# Altium PCB 后改2025底板线路板图.PcbDoc (part 3 of 4)
Units mm, origin at the board's own origin, x right, y up, seen from the top; angles counter-clockwise.
Board outline 200 x 230 mm, 4 copper layers (Top Layer, GND, POWER, Bottom Layer), stack 0.603 mm thick; 355 components, 331 nets, 1313 pads, 565 vias.
Unrouted connection lines stored in the file: 251.
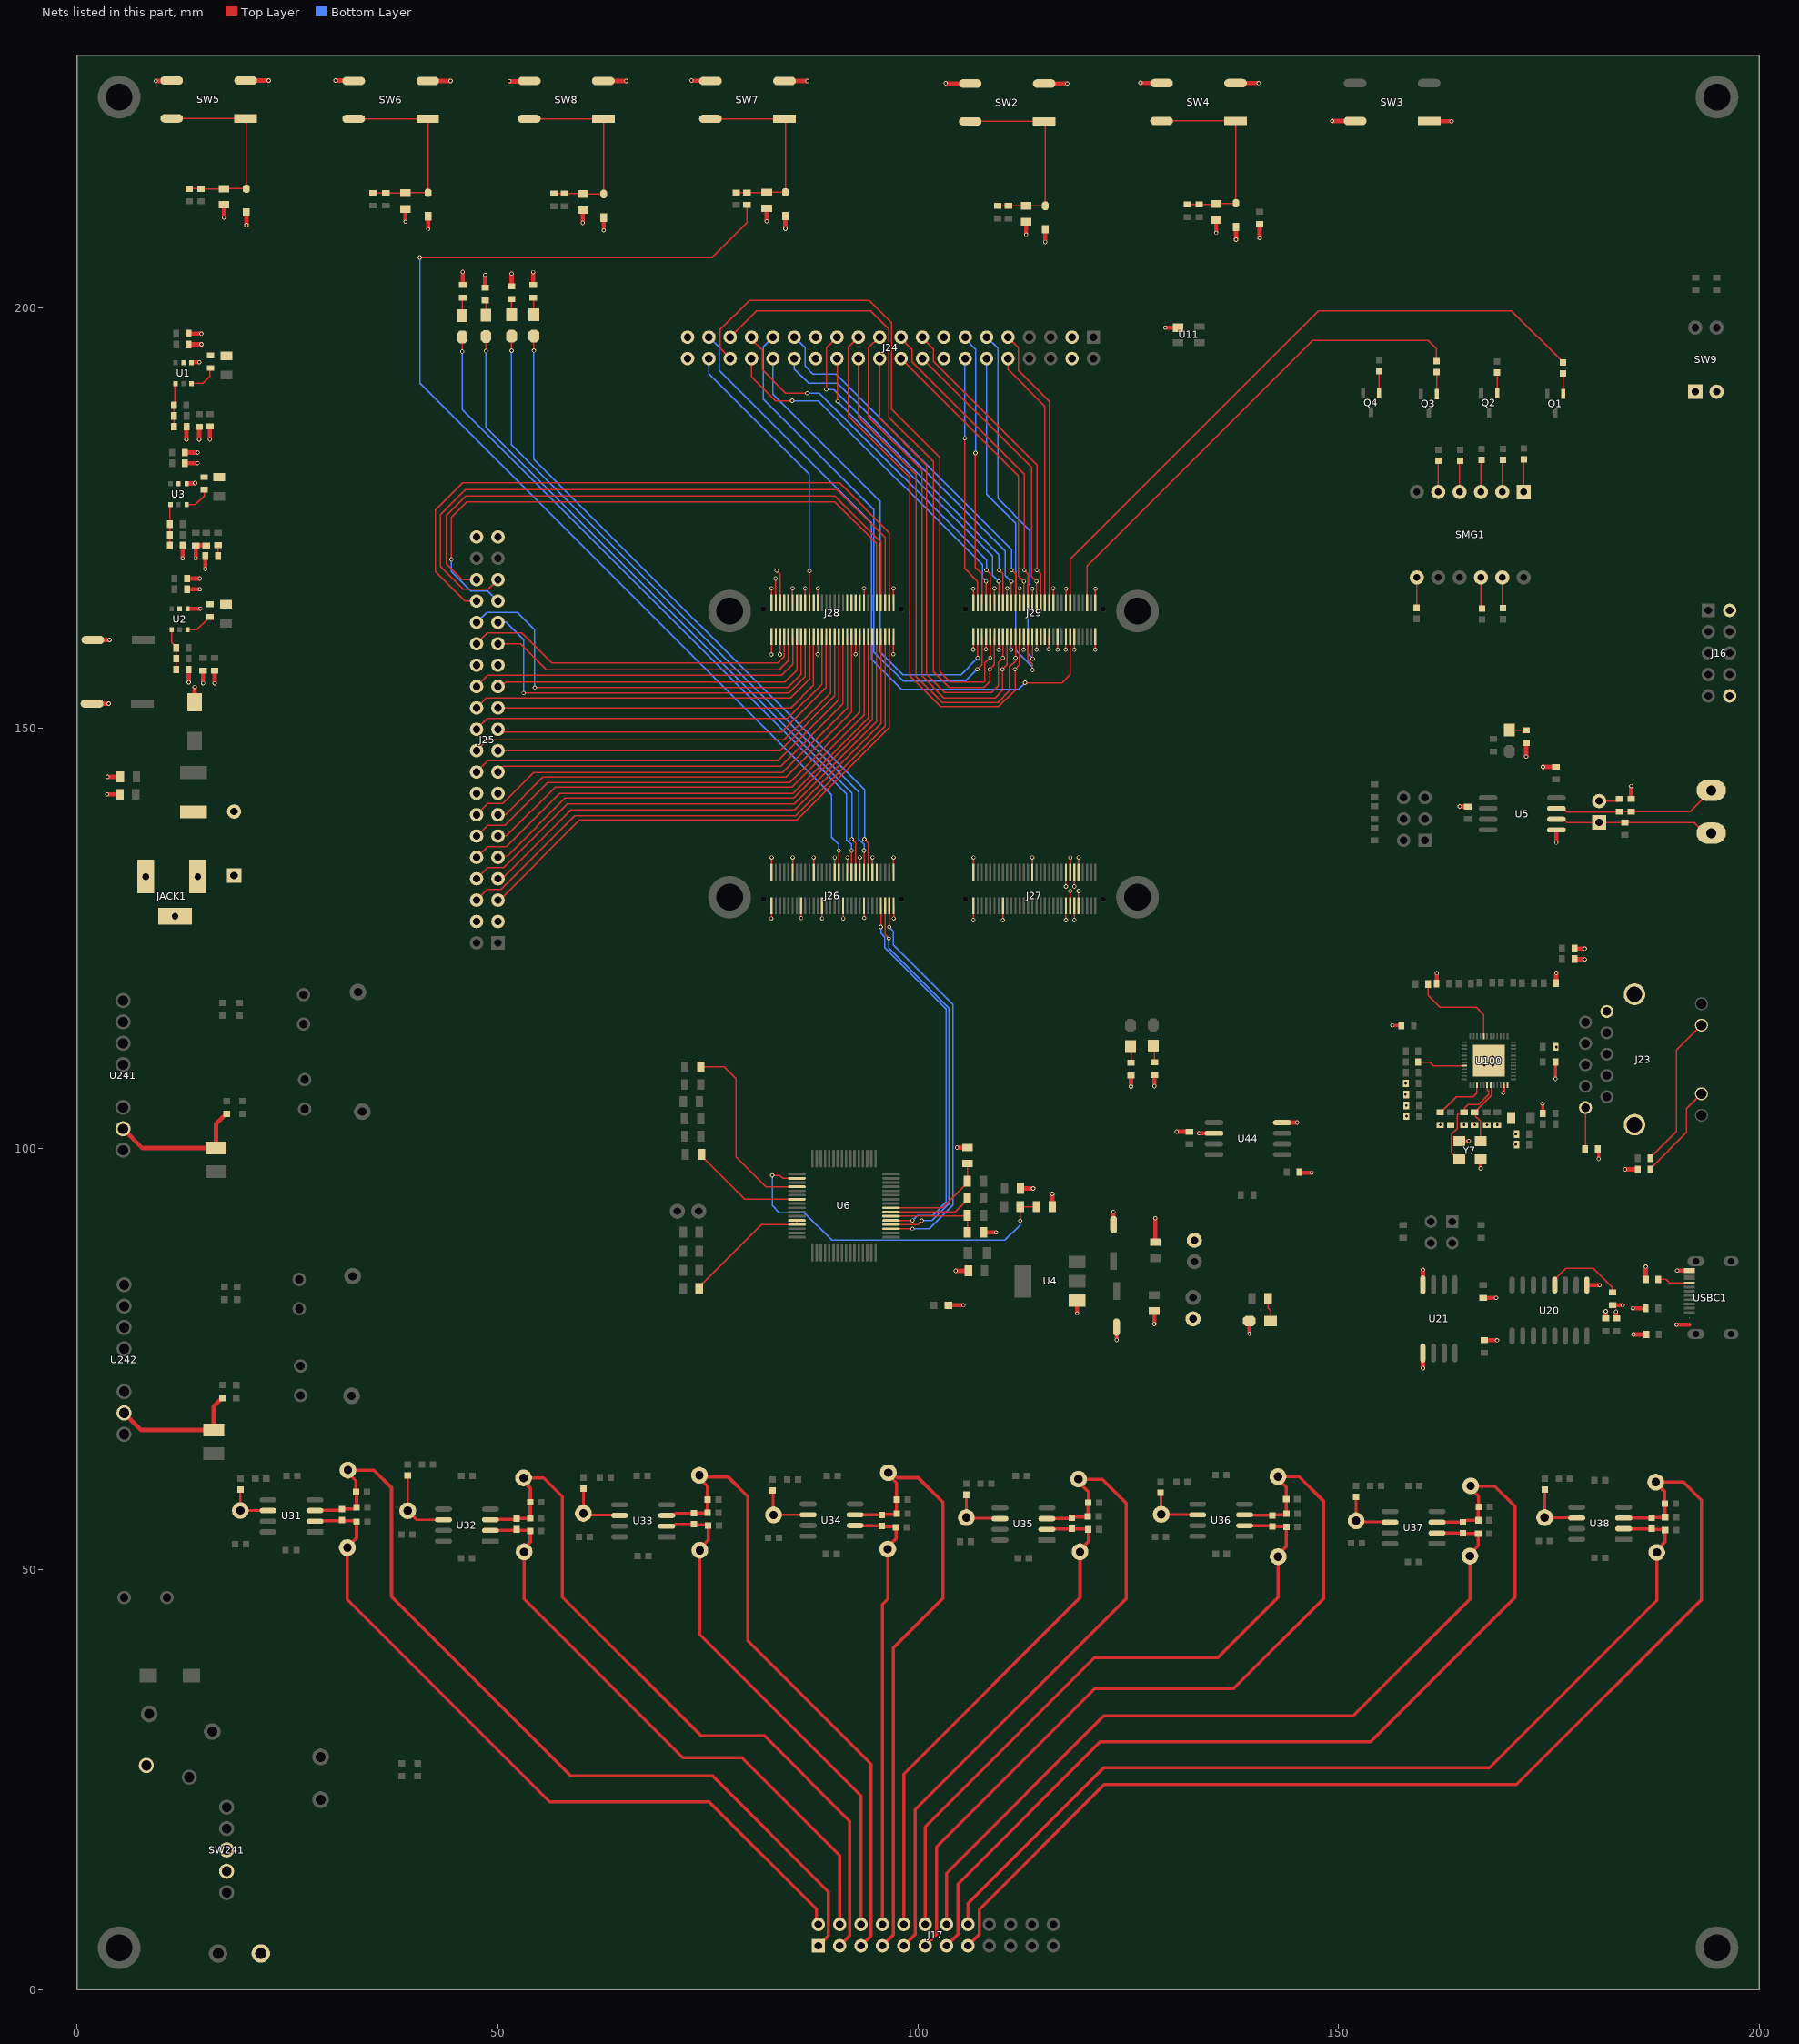
[diagram p5: the nets of this part, all layers, seen from the top]

## Via types
v1: diameter 0.508, hole 0.305, Top Layer to Bottom Layer, tented both sides, 558 vias
v2: diameter 0.635, hole 0.305, Top Layer to Bottom Layer, tented both sides, 7 vias

## Nets (pads, with @x,y where several pads share a name; then routed paths per layer and width w, separated by ;. In a path a pad name is that pad's centre, name@x,y a point inside that pad or via, vN(x,y) a via of type N, cw(c..) or ccw(c..) an arc to the next point about the centre after c; other vN are vias at no path point) (continued)
GND: C1.2 C2.2 C3.1 C4.1 C7.1 C8.1 C9.1 C10.1 C11.1 C12.1 C13.1 C14.1 C18.1 C19.1 C20.1 C21.1 C25.1 C29.1 C31.1 C35.1 C36.1 C37.1 C38.1 C39.1 C41.1 C42.1 C52.1 C53.1 C54.1 C55.1 C64.1 C65.2 C78.1 C79.1 C80.1 C81.1 C82.1 C83.1 C84.1 C113.1 C114.1 C146.1 C147.2 C148.2 C151.1 C152.1 C153.1 C154.1 C155.1 C156.1 C157.1 C158.1 CE1.2 CE2.2 D1.2 D2.1 J3.2 J4.2 J16.2 J16.10 J23.10 J23.15 J23.16 J24.3 J24.4 J24.15 J24.16 J24.27 J24.28 J24.39 J24.40 J25.3 J25.4 J25.15 J25.16 J25.27 J25.28 J25.39 J25.40 J26.1@97.078,128.889 J26.2 J26.12 J26.15 J26.18 J26.24 J26.25 J26.30 J26.35 J26.40 J26.45 J26.50 J26.59 J26.60 J27.9 J27.10 J27.11 J27.12 J27.13 J27.14 J27.15 J27.16 J27.32 J27.45 J27.59 J27.60 J28.1@97.078,164.889 J28.2 J28.15 J28.20 J28.37 J28.38 J28.43 J28.49 J28.56 J28.59 J28.60 J29.1@121.078,164.889 J29.2 J29.12 J29.15 J29.16 J29.20 J29.21 J29.24 J29.30 J29.31 J29.36 J29.37 J29.42 J29.43 J29.48 J29.49 J29.54 J29.59 J29.60 JACK1.2 JACK1.3 L4.2 LED1.2 R8.1 R9.1 R11.1 R13.1 R16.1 R17.1 R18.2 R19.1 R48.1 R52.1 R55.2 R57.1 R64.2 R96.1 R99.1 R103.1 R105.1 R106.1 R107.1 R113.1 R184.2 R185.2 R189.1 SW2.2 SW2.3 SW3.1 SW3.4 SW4.2 SW4.3 SW5.2 SW5.3 SW6.2 SW6.3 SW7.2 SW7.3 SW8.2 SW8.3 SW9.1 SW9.2 U1.1 U2.1 U3.1 U4.1 U5.5 U11.1 U20.1 U21.4 U21.5 U44.2 U44.8 U100.47 U100.49 USBC1.A1B12 USBC1.B1A12 Y7.2 Y7.4 Z1.1 Z2.1 Z3.1 Z4.1 Z5.1 Z6.1 | length 265.7
  Top Layer w0.152: v1(82.55,127.368) 82.564,127.382 82.564,128.875 J26.59@82.578,128.889 ; v1(82.55,158.75) 82.564,158.764 82.564,160.875 J28.60@82.578,160.889 ; J28.59@82.57,164.881 J28.59@82.578,164.889 v1(82.578,166.609) ; J26.60@82.578,132.889 82.582,132.893 82.582,134.613 v1(82.586,134.617) ; v1(83.566,158.75) 83.572,158.756 83.572,160.883 J28.56@83.578,160.889 ; J28.49@85.071,164.881 J28.49@85.078,164.889 v1(85.078,166.609) ; J26.50@85.078,132.889 85.082,132.893 85.082,134.613 v1(85.086,134.617) ; J26.45@86.078,128.889 86.087,128.88 86.087,127.415 v1(86.096,127.406) ; J28.43@86.57,164.881 J28.43@86.578,164.889 v1(86.578,166.609) ; J26.40@87.574,132.885 J26.40@87.578,132.889 87.578,134.609 v1(87.582,134.613) ; J28.37@88.071,164.881 J28.37@88.078,164.889 v1(88.078,166.609) ; v1@88.078,158.778 J28.38@88.078,160.889 ; J26.35@88.578,128.889 88.58,128.887 88.58,127.371 v1(88.582,127.368) ; J26.30@90.074,132.885 J26.30@90.078,132.889 90.078,134.609 v1(90.082,134.613) ; J26.25@91.078,128.889 91.099,128.868 v1(91.099,127.368) v1@91.089,127.379 ; J26.24@91.574,132.885 J26.24@91.578,132.889 91.578,134.609 v1(91.582,134.613) ; v1@92.578,158.778 J28.20@92.578,160.889 ; J26.18@93.074,132.885 J26.18@93.078,132.889 93.078,134.609 v1(93.082,134.613) ; J28.15@93.57,164.881 J28.15@93.578,164.889 v1(93.578,166.609) ; J26.15@93.578,128.889 93.587,128.88 93.587,127.415 v1(93.595,127.406) ; J26.12@94.574,132.885 J26.12@94.578,132.889 94.578,134.609 v1(94.582,134.613) ; J28.1@97.071,164.881 J28.1@97.078,164.889 v1(97.078,166.609) ; J26.2@97.074,132.885 J26.2@97.078,132.889 97.078,134.609 v1(97.082,134.613) ; J26.1@97.078,128.889 97.099,128.868 v1(97.099,127.368) v1@97.089,127.379 ; v1@97.078,158.778 J28.2@97.078,160.889 ; v1(106.553,159.334) 106.553,160.864 J29.60@106.578,160.889 J29.60@106.584,160.895 ; v1(106.553,166.56) 106.565,166.548 106.565,164.901 J29.59@106.578,164.889 ; v1(106.572,127.163) 106.576,127.167 106.576,128.887 J27.59@106.58,128.891 ; J27.60@106.576,132.887 106.58,132.891 106.58,134.611 v1(106.584,134.615) ; v1(108.065,159.373) 108.065,160.876 J29.54@108.078,160.889 J29.54@108.084,160.895 ; J29.49@109.078,164.889 109.086,164.896 v1(109.086,166.617) ; v1(109.576,159.309) v1(109.576,159.309) 109.577,160.878 J29.48@109.576,160.879 ; v1(110.072,127.163) 110.076,127.167 110.076,128.887 J27.45@110.08,128.891 ; J29.43@110.578,164.889 110.593,164.904 v1(110.593,166.6) ; v1(111.063,159.323) 111.063,160.874 J29.42@111.078,160.889 J29.42@111.084,160.895 ; J29.37@112.078,164.889 v1(112.078,166.624) ; v1(112.557,159.317) 112.557,160.868 J29.36@112.578,160.889 ; J27.32@113.576,132.887 113.58,132.891 113.58,134.611 v1(113.584,134.615) ; J29.31@113.578,164.889 113.59,164.901 v1(113.59,166.549) ; J29.30@114.084,160.895 114.087,160.892 114.087,159.318 v1(114.097,159.309) ; v1(115.519,159.368) 115.549,159.398 115.549,160.86 J29.24@115.574,160.885 ; J29.21@116.078,164.889 v1(116.078,166.624) ; J29.20@116.582,160.893 116.582,159.313 v1(116.586,159.309) ; v1(117.551,159.309) 117.565,159.322 117.565,160.876 J29.16@117.578,160.889 J29.16@117.584,160.895 ; v1(117.57,127.161) 117.574,127.165 117.574,128.885 J27.15@117.578,128.889 ; v1(117.57,131.161) 117.574,131.165 117.574,132.885 J27.16@117.578,132.889 ; J29.15@117.578,164.889 117.59,164.901 v1(117.59,166.549) ; J27.13@118.078,128.889 118.082,128.893 118.082,130.613 v1(118.086,130.617) ; J27.14@118.078,132.889 118.082,132.893 118.082,134.613 v1(118.086,134.617) ; v1(118.567,159.309) 118.573,159.314 118.573,160.884 J29.12@118.578,160.889 J29.12@118.584,160.895 ; v1(118.57,127.161) 118.574,127.165 118.574,128.885 J27.11@118.578,128.889 ; v1(118.57,131.161) 118.574,131.165 118.574,132.885 J27.12@118.578,132.889 ; J27.9@119.078,128.889 119.082,128.893 119.082,130.613 v1(119.086,130.617) ; J27.10@119.078,132.889 119.082,132.893 119.082,134.613 v1(119.086,134.617) ; v1(121.056,159.309) 121.067,159.32 121.067,160.878 J29.2@121.078,160.889 J29.2@121.084,160.895 ; J29.1@121.078,164.889 121.09,164.901 121.09,166.549 v1(121.102,166.56)
  Top Layer w0.254: SW5.2@20.021,227.004 SW5.2@20.046,226.979 ; SW6.2@41.662,226.953 SW6.2@41.687,226.928 ; SW8.2@62.541,226.953 SW8.2@62.566,226.928 ; SW7.2@84.08,226.953 SW7.2@84.105,226.928 ; SW2.2@114.966,226.648 SW2.2@114.992,226.623 ; SW4.2@137.725,226.699 SW4.2@137.75,226.674 ; SW3.4@151.962,222.174 SW3.4@151.988,222.148 ; SW3.1@160.661,222.174 SW3.1@160.686,222.148 ; v1(169.582,106.629) 169.582,106.698 169.665,106.781 U100.47@169.665,107.544
  Top Layer w0.381: v1@156.396,114.656 C155.1@157.541,114.656 ; Y7.2@164.338,100.904 v1@165.483,100.904 ; v1@166.878,97.659 Y7.4@166.878,98.804 ; C154.1@174.26,104.191 v1@174.26,105.336 ; v1(175.787,108.299) C52.1@175.787,110.305 ; v1@180.907,98.779 C42.1@180.907,99.924
  Top Layer w0.508: C1.2@1.775,152.908 v1(3.762,152.908) ; C2.2@1.874,160.477 v1(3.861,160.477) ; v1(3.561,142.113) C3.1@5.085,142.113 ; v1(3.622,144.2) C4.1@5.146,144.2 ; v1(9.347,226.924) 11.191,226.924 SW5.3@11.246,226.979 ; v1(12.549,170.18) R13.1@12.549,171.704 ; C18.1@12.815,181.483 v1(14.339,181.483) ; C19.1@12.815,182.753 v1(14.339,182.753) ; v1(13.008,184.308) R8.1@13.008,185.832 ; U3.1@13.015,179.07 13.936,179.07 13.999,179.133 v1(14.034,179.133) ; C10.1@13.069,166.497 v1(14.593,166.497) ; C9.1@13.069,167.767 v1(14.593,167.767) ; U2.1@13.142,164.171 v1(14.666,164.171) ; C7.1@13.269,195.611 v1(14.793,195.611) ; C8.1@13.269,196.881 v1(14.793,196.881) ; v1(13.272,155.439) R9.1@13.272,156.963 ; U1.1@13.523,193.484 v1(14.541,193.484) ; D2.1@13.97,153.063 v1(13.97,154.889) ; v1(14.097,170.192) C21.1@14.097,171.716 C20.1@15.367,171.716 ; v1(14.511,184.308) C13.1@14.511,185.832 ; v1(14.986,155.321) C14.1@14.986,156.845 ; v1(15.24,168.91) LED1.2@15.24,170.434 ; v1(15.781,184.32) C11.1@15.781,185.844 ; v1(16.352,155.324) C12.1@16.352,156.848 ; v1(17.463,210.687) C81.1@17.463,212.211 ; SW5.2@20.046,226.979 v1(22.784,226.979) ; v1(20.13,209.79) Z3.1@20.13,211.314 ; v1(30.734,226.979) SW6.3@32.989,226.979 ; v1(39.044,210.187) C82.1@39.044,211.711 ; SW6.2@41.687,226.928 v1(44.425,226.928) ; v1(41.726,209.316) Z4.1@41.726,210.84 ; R106.1@45.86,202.685 v1(45.86,204.209) ; R107.1@48.522,202.348 v1(48.522,203.872) ; v1(51.41,226.898) 51.433,226.875 53.813,226.875 SW8.3@53.836,226.852 ; R103.1@51.656,202.501 v1(51.656,204.025) ; R105.1@54.242,202.68 v1(54.242,204.204) ; v1(60.135,210.06) C84.1@60.135,211.584 ; SW8.2@62.566,226.928 v1(65.303,226.928) ; v1(62.611,209.166) Z6.1@62.611,210.69 ; v1(73.05,226.974) 73.074,226.951 75.384,226.951 SW7.3@75.407,226.928 ; v1(81.998,210.252) C83.1@81.998,211.776 ; SW7.2@84.105,226.928 v1(86.843,226.928) ; v1(84.22,209.358) Z5.1@84.22,210.882 ; v1(103.276,226.67) 103.3,226.646 106.372,226.646 SW2.3@106.395,226.623 ; L4.2@103.861,81.382 v1(105.385,81.382) ; v1(104.46,85.471) C41.1@105.984,85.471 ; v1(104.623,100.139) R16.1@105.857,100.139 ; R19.1@107.757,90.043 v1(109.281,90.043) ; C29.1@112.169,95.258 v1(113.693,95.258) ; v1(112.84,208.666) C78.1@112.84,210.19 ; SW2.2@114.992,226.623 v1(117.729,226.623) ; v1(115.126,207.772) Z1.1@115.126,209.296 ; R11.1@115.954,93.099 v1(115.954,94.623) ; v1(118.91,80.411) U4.1@118.91,81.935 ; CE1.2@123.241,90.948 v1(123.241,92.472) ; v1(123.596,77.25) CE2.2@123.596,78.774 ; R99.1@125.311,108.711 125.313,108.708 125.313,107.38 v1(125.316,107.377) ; v1(126.441,226.72) 126.464,226.697 129.028,226.697 SW4.3@129.052,226.674 ; v1(128.08,79.156) C35.1@128.08,80.68 ; R96.1@128.087,108.761 128.089,108.759 128.089,107.43 v1(128.092,107.428) ; C31.1@128.207,88.875 v1(128.207,91.719) ; v1(129.388,197.587) U11.1@130.912,197.587 ; v1(130.743,102.02) C113.1@132.267,102.02 ; v1(133.405,101.829) U44.2@134.929,101.829 ; v1(135.445,208.884) C80.1@135.445,210.408 ; SW4.2@137.75,226.674 v1(140.487,226.674) ; v1(137.795,208.048) Z2.1@137.795,209.572 ; v1(139.382,77.978) D1.2@139.382,79.502 ; v1(140.614,208.282) C79.1@140.614,209.806 ; U44.8@143.557,103.099 v1(145.081,103.099) ; C114.1@145.281,97.14 v1(146.805,97.14) ; v1(149.225,222.174) SW3.4@151.962,222.174 ; v1(160.02,73.914) U21.5@160.02,75.692 ; U21.4@160.02,83.82 v1(160.02,85.598) ; SW3.1@160.686,222.148 v1(163.424,222.148) ; R57.1@161.646,119.634 161.659,119.647 161.659,120.84 v1(161.672,120.853) ; v1(164.389,140.679) R17.1@165.354,140.679 ; C65.2@167.195,82.257 v1(168.719,82.257) ; C64.1@167.322,77.216 v1(168.846,77.216) ; v1(172.291,146.601) R113.1@172.291,148.125 ; v1(174.308,145.39) C25.1@175.832,145.39 ; R52.1@175.858,119.685 175.871,119.698 175.871,120.891 v1(175.884,120.904) ; v1(175.895,136.373) U5.5@175.895,137.897 ; C36.1@178.054,122.53 178.067,122.516 179.26,122.516 v1(179.273,122.503) ; C37.1@178.054,123.8 178.067,123.786 179.26,123.786 v1(179.273,123.773) ; U20.1@179.514,83.782 v1(181.038,83.782) ; v1(181.762,80.67) 181.766,80.667 181.766,79.913 181.769,79.909 C147.2@181.769,79.817 ; C146.1@182.562,81.319 C146.1@182.625,81.382 ; C146.1@182.562,81.419 182.6,81.382 C146.1@182.625,81.382 ; C146.1@182.644,81.4 C146.1@182.625,81.382 ; v1(182.982,80.62) 182.982,79.913 183.039,79.855 C148.2@183.039,79.817 ; v1@183.761,81.382 C146.1@182.625,81.382 ; v1(184.064,97.542) R48.1@185.588,97.542 ; R18.2@184.785,141.58 v1(184.785,143.104) ; v1(184.987,81.026) R185.2@186.511,81.026 ; v1(185.051,77.915) R189.1@186.575,77.915 ; R184.2@186.524,84.455 v1(186.524,85.979) ; v1(190.183,79.084) USBC1.A1B12@191.707,79.084 ; v1(190.25,85.494) USBC1.B1A12@191.774,85.494
  other v1: 183.794,81.382 166.884,97.653 180.914,98.772 171.064,100.477 165.489,100.911 171.064,101.727 162.069,102.828 164.913,102.828 166.171,102.828 167.636,102.828 168.865,102.828 158.063,103.858 158.051,105.128 174.254,105.342 157.951,106.426 157.983,107.753 167.335,109.931 168.351,109.931 167.335,110.896 168.351,110.896 175.887,112.091 156.39,114.649 88.064,158.764 92.564,158.764 97.064,158.764
H15: J26.28 R109.2 | length 136.4
  Top Layer w0.152: v1(40.742,205.943) 75.489,205.943 79.648,210.102 R109.2@79.648,212.176 ; J26.28@90.578,132.889 v1(90.578,135.433)
  Bottom Layer w0.152: v1(40.742,205.943) 40.742,191.008 89.713,142.037 89.713,137.012 90.578,136.147 v1(90.578,135.433)
H16: J28.51
H17: J28.53
H18: J28.57 | length 2.9
  Top Layer w0.152: v1(83.058,167.767) 83.068,167.757 83.068,164.899 J28.57@83.078,164.889
IO1+: 12.1 C202.2 J17.1 R201.2 R211.1 U31.3 | length 102
  Top Layer w0.381: U31.3@28.287,56.974 28.331,57.018 31.364,57.018 R201.2@31.496,57.15 32.995,57.15 C202.2@33.225,57.38 R211.1@33.225,58.88 ; R211.1@33.149,59.172 33.149,60.515 32.194,61.47 12.1@32.194,61.783 35.285,61.783 37.389,59.679 37.389,46.736 58.674,25.451 75.54,25.451 89.332,11.659 89.332,6.426 J17.1@88.138,5.232
IO1-: 11.1 C201.1 J17.2 R201.1 U31.2 | length 87.7
  Top Layer w0.381: U31.2@28.287,55.704 28.331,55.748 31.394,55.748 R201.1@31.496,55.85 ; R201.1@31.503,55.843 31.56,55.786 33.041,55.786 C201.1@33.225,55.602 33.225,53.706 32.131,52.612 11.1@32.131,52.578 32.131,46.406 56.185,22.352 75.133,22.352 87.905,9.58 87.905,8.006 J17.2@88.138,7.772
IO2+: 22.1 C206.2 J17.3 R202.2 R212.1 U32.3 | length 87.9
  Top Layer w0.381: U32.3@49.149,55.88 49.193,55.924 52.147,55.924 R202.2@52.261,56.037 52.277,56.054 53.865,56.054 C206.2@53.881,56.07 R212.1@53.881,57.963 53.881,59.625 53.086,60.42 22.1@53.086,60.858 55.47,60.858 57.709,58.62 57.709,46.685 74.219,30.175 81.737,30.175 91.872,20.041 91.872,6.426 J17.3@90.678,5.232
IO2-: 21.1 C205.1 J17.4 R202.1 U32.2 | length 71.6
  Top Layer w0.381: U32.2@49.149,54.61 49.193,54.654 52.177,54.654 R202.1@52.261,54.737 52.356,54.642 53.786,54.642 C205.1@53.881,54.546 53.881,53.24 53.149,52.508 21.1@53.149,52.07 53.149,46.469 72.028,27.591 79.038,27.591 90.678,15.951 J17.4@90.678,7.772
IO3+: 32.1 C210.2 J17.5 R203.2 R213.1 U33.3 | length 76.3
  Top Layer w0.381: U33.3@70.104,56.388 70.877,56.388 71.131,56.642 R203.2@73.343,56.642 73.374,56.674 74.932,56.674 C210.2@74.963,56.706 R213.1@74.963,57.946 ; R213.1@74.951,58.268 74.951,59.893 73.998,60.846 32.1@73.998,61.163 74.232,60.93 77.45,60.93 79.756,58.623 79.756,41.504 94.412,26.848 94.412,6.426 J17.5@93.218,5.232
IO3-: 31.1 C209.1 J17.6 R203.1 U33.2 | length 60.9
  Top Layer w0.381: U33.2@70.104,55.118 70.877,55.118 71.101,55.342 R203.1@73.343,55.342 73.423,55.262 74.962,55.262 C209.1@75.042,55.181 75.042,53.482 74.041,52.481 31.1@74.041,52.261 74.041,42.24 93.218,23.063 J17.6@93.218,7.772
IO4+: 42.1 C214.2 J17.7 R204.2 R214.1 U34.3 | length 73.7
  Top Layer w0.381: U34.3@92.51,56.466 92.534,56.442 95.671,56.442 R204.2@95.694,56.418 95.775,56.498 97.362,56.498 C214.2@97.442,56.578 R214.1@97.442,57.946 ; J17.7@95.758,5.232 97.079,6.553 97.079,40.691 102.972,46.584 102.972,57.912 100.01,60.874 97.496,60.874 96.895,61.475 42.1@96.456,61.475 96.456,61.225 97.442,60.239 R214.1@97.442,58.268
IO4-: 41.1 C213.1 J17.8 R204.1 U34.2 | length 52.8
  Top Layer w0.381: U34.2@92.51,55.196 92.549,55.157 95.656,55.157 R204.1@95.694,55.118 95.758,55.054 97.315,55.054 C213.1@97.379,54.991 97.379,53.624 96.393,52.638 41.1@96.393,52.387 96.393,46.457 95.758,45.822 J17.8@95.758,7.772
IO5+: 52.1 C218.2 J17.9 R205.2 R215.1 U35.3 | length 80.4
  Top Layer w0.381: J17.9@98.298,5.232 99.644,6.579 99.644,21.412 124.765,46.533 124.765,57.836 121.895,60.706 52.1@119.075,60.706 119.075,60.359 120.239,59.195 R215.1@120.239,57.912 120.215,57.888 120.215,56.285 C218.2@120.191,56.261 120.11,56.181 118.381,56.181 R205.2@118.3,56.101 118.251,56.051 115.36,56.051 U35.3@115.316,56.007
IO5-: 51.1 C217.1 J17.10 R205.1 U35.2 | length 61
  Top Layer w0.381: J17.10@98.298,7.772 98.298,25.654 119.253,46.609 51.1@119.253,52.07 119.253,52.32 120.239,53.306 C217.1@120.239,54.737 120.207,54.769 118.332,54.769 R205.1@118.3,54.8 118.269,54.769 115.348,54.769 U35.2@115.316,54.737
IO6+: 62.1 C222.2 J17.11 R206.2 R216.1 U36.3 | length 98.7
  Top Layer w0.381: J17.11@100.838,5.232 102.184,6.579 102.184,16.993 121.006,35.814 137.516,35.814 148.184,46.482 148.184,58.115 145.288,61.011 62.1@142.789,61.011 142.789,60.76 143.774,59.774 R216.1@143.774,58.318 143.786,58.307 143.786,56.59 C222.2@143.797,56.578 143.71,56.491 142.201,56.491 R206.2@142.113,56.403 142.087,56.429 138.853,56.429 U36.3@138.826,56.456
IO6-: 61.1 C221.1 J17.12 R206.1 U36.2 | length 78.7
  Top Layer w0.381: J17.12@100.838,7.772 100.838,19.355 120.955,39.472 135.636,39.472 142.811,46.647 61.1@142.811,51.498 142.811,51.749 143.797,52.735 C221.1@143.797,55.054 143.773,55.079 142.137,55.079 R206.1@142.113,55.103 142.072,55.144 138.868,55.144 U36.2@138.826,55.186
IO7+: 72.1 C226.2 J17.13 R207.2 R217.1 U37.3 | length 114.8
  Top Layer w0.381: J17.13@103.378,5.232 104.724,6.579 104.724,12.573 121.615,29.464 153.772,29.464 170.993,46.685 170.993,57.455 168.554,59.893 72.1@165.71,59.893 165.71,59.592 166.67,58.631 R217.1@166.67,57.389 ; U37.3@161.695,55.582 161.697,55.58 164.78,55.58 R207.2@164.783,55.577 164.973,55.768 165.148,55.768 165.196,55.817 C226.2@166.609,55.817 R217.1@166.609,57.389
IO7-: 71.1 C225.1 J17.14 R207.1 U37.2 | length 95
  Top Layer w0.381: J17.14@103.378,7.772 103.378,13.868 122.072,32.563 151.74,32.563 165.608,46.431 71.1@165.608,51.562 165.608,51.812 166.594,52.798 C225.1@166.594,54.229 166.57,54.253 164.807,54.253 R207.1@164.783,54.277 164.765,54.295 161.712,54.295 U37.2@161.695,54.312
IO8+: 82.1 C230.2 J17.15 R208.2 R218.1 U38.3 | length 133.7
  Top Layer w0.381: J17.15@105.918,5.232 107.264,6.579 107.264,9.525 122.123,24.384 171.145,24.384 193.142,46.38 193.142,58.217 191.008,60.35 82.1@187.706,60.35 187.706,60.282 188.783,59.205 R218.1@188.783,57.81 188.801,57.792 188.801,56.215 C230.2@188.819,56.197 188.77,56.149 187.246,56.149 R208.2@187.198,56.101 187.19,56.093 183.904,56.093 U38.3@183.896,56.085
IO8-: 81.1 C229.1 J17.16 R208.1 U38.2 | length 113.1
  Top Layer w0.381: J17.16@105.918,7.772 105.918,10.262 122.072,26.416 167.945,26.416 187.833,46.304 81.1@187.833,52.006 187.833,52.257 188.819,53.243 C229.1@188.819,54.673 188.755,54.737 187.261,54.737 R208.1@187.198,54.8 187.191,54.808 183.903,54.808 U38.2@183.896,54.815
IO13_L6N: J24.37 J29.14 | length 76.7
  Top Layer w0.152: v1(112.712,155.385) 117.094,155.385 118.078,156.368 J29.14@118.078,160.889
  Bottom Layer w0.152: J24.37@75.12,196.469 76.327,195.262 76.327,192.507 94.437,174.396 94.437,158.191 98.038,154.591 111.919,154.591 v1(112.712,155.385)
IO13_L11N: J24.31 J29.56 | length 61.8
  Top Layer w0.152: v1(107.031,156.995) 107.578,157.541 J29.56@107.578,160.889
  Bottom Layer w0.152: J24.31@82.74,196.469 81.597,195.326 81.597,189.116 94.742,175.971 94.742,159.067 98.234,155.575 105.611,155.575 v1(107.031,156.995)
IO13_L11P: J24.32 J29.58 | length 56.2
  Top Layer w0.152: v1(107.078,158.345) J29.58@107.078,160.889
  Bottom Layer w0.152: J24.32@82.74,193.929 82.74,189.697 95.504,176.933 95.504,159.067 98.209,156.362 105.095,156.362 v1(107.078,158.345)
IO13_L12N: J24.35 J29.50 | length 77.3
  Top Layer w0.152: J24.35@77.66,196.469 80.772,199.581 94.361,199.581 96.52,197.421 96.52,186.944 101.79,181.673 101.79,156.718 103.695,154.813 107.823,154.813 108.531,155.521 v1(108.531,156.995) 109.078,157.541 J29.50@109.078,160.889
IO13_L12P: J24.36 J29.52 | length 82.3
  Top Layer w0.152: J24.36@77.66,193.929 76.454,195.135 76.454,197.358 79.947,200.85 94.17,200.85 96.825,198.196 96.825,187.909 102.552,182.181 102.552,156.718 103.822,155.448 107.846,155.448 107.95,155.552 107.95,157.717 v1(108.578,158.345) J29.52@108.578,160.889
IO13_L13N: J24.21 J29.44 | length 61.1
  Top Layer w0.152: J24.21@95.441,196.469 95.377,196.469 94.107,195.199 94.107,187.007 100.457,180.657 100.457,156.21 103.06,153.606 109.156,153.606 110.031,154.481 v1(110.031,156.995) 110.578,157.541 J29.44@110.578,160.889
IO13_L13P: J24.22 J29.46 | length 55.6
  Top Layer w0.152: J24.22@95.441,193.929 95.441,186.817 101.028,181.229 101.028,156.4 103.188,154.242 108.712,154.242 109.523,155.053 109.523,157.791 v1(110.078,158.345) J29.46@110.078,160.889
IO13_L14N: J24.23 J29.38 | length 65.3
  Top Layer w0.152: J24.23@92.9,196.469 91.694,195.262 91.694,187.129 98.996,179.827 98.996,156.21 102.679,152.527 109.537,152.527 111.531,154.521 v1(111.531,156.995) 112.06,157.524 112.06,160.871 J29.38@112.078,160.889
IO13_L14P: J24.24 J29.40 | length 60.4
  Top Layer w0.152: J24.24@92.9,193.929 92.9,187.007 99.758,180.149 99.758,156.147 102.87,153.035 109.474,153.035 110.871,154.432 110.871,157.232 111.578,157.938 v1(111.578,158.345) J29.40@111.578,160.889
IO13_L15N: J24.11 J29.32 | length 43.3
  Top Layer w0.152: J29.32@113.578,160.889 113.609,160.858 113.609,158.273 v1(113.64,158.242)
  Bottom Layer w0.152: J24.11@108.14,196.469 109.474,195.135 109.474,177.292 113.284,173.482 113.284,167.132 113.078,166.926 113.078,158.804 v1(113.64,158.242)
IO13_L15P: J24.12 J29.34 | length 43.5
  Top Layer w0.152: J29.34@113.078,160.889 113.078,158.085 113.606,157.557 v1(113.606,156.899)
  Bottom Layer w0.152: J24.12@108.14,193.929 108.14,177.8 111.607,174.333 111.607,166.836 111.595,166.824 111.595,166.424 111.607,166.412 111.607,159.284 113.555,157.336 113.555,156.95 v1(113.606,156.899)
IO13_L16N: J24.13 J29.55 | length 32.5
  Top Layer w0.152: v1(106.807,182.689) 106.807,169.1 107.578,168.33 J29.55@107.578,164.889
  Bottom Layer w0.152: J24.13@105.6,196.469 105.6,196.278 106.87,195.008 106.87,182.753 v1(106.807,182.689)
IO13_L16P: J24.14 J29.57 | length 29.7
  Top Layer w0.152: v1(105.537,184.468) 105.537,168.974 107.078,167.432 J29.57@107.078,164.889
  Bottom Layer w0.152: v1(105.537,184.468) 105.569,184.499 105.569,193.897 J24.14@105.6,193.929
IO13_L17N: J24.33 J29.51 | length 45.7
  Top Layer w0.152: J24.33@80.2,196.469 80.2,196.215 81.471,194.945 81.471,192.595 84.264,189.802 v1(86.804,189.802) ; v1(108.124,168.783) 108.578,168.33 J29.51@108.578,164.889
  Bottom Layer w0.152: v1(86.804,189.802) 88.265,189.802 108.124,169.942 v1(108.124,168.783)
IO13_L17P: J24.34 J29.53 | length 43.6
  Top Layer w0.152: J24.34@80.2,193.929 80.2,191.77 83.058,188.912 v1(85.026,188.912) ; J29.53@108.078,164.889 v1(108.078,167.432)
  Bottom Layer w0.152: v1(85.026,188.912) 88.138,188.912 107.632,169.418 107.632,167.878 v1(108.078,167.432)
IO13_L18N: J24.25 J29.45 | length 41.3
  Top Layer w0.152: v1(89.09,190.246) 89.09,195.199 J24.25@90.361,196.469 ; v1(109.624,168.783) 110.078,168.33 J29.45@110.078,164.889
  Bottom Layer w0.152: v1(89.09,190.246) 89.98,190.246 109.624,170.601 v1(109.624,168.783)
IO13_L18P: J24.26 J29.47 | length 37
  Top Layer w0.152: J24.26@90.361,193.929 90.392,193.897 90.392,188.881 v1(90.424,188.849) ; J29.47@109.578,164.889 v1(109.578,167.432)
  Bottom Layer w0.152: v1(90.424,188.849) 108.839,170.434 108.839,168.171 v1(109.578,167.432)
IO13_L19N: J24.29 J29.39 | length 44.1
  Top Layer w0.152: v1(111.124,168.783) 111.578,168.33 J29.39@111.578,164.889
  Bottom Layer w0.152: J24.29@85.281,196.469 86.55,195.199 86.55,193.04 87.503,192.088 90.233,192.088 111.124,171.197 v1(111.124,168.783)
IO13_L19P: J24.30 J29.41 | length 41.7
  Top Layer w0.152: J29.41@111.078,164.889 v1(111.078,167.432)
  Bottom Layer w0.152: J24.30@85.281,193.929 85.281,192.701 86.974,191.008 90.424,191.008 110.363,171.069 110.363,168.147 v1(111.078,167.432)
IO13_L20N: J24.19 J29.33 | length 37.8
  Top Layer w0.152: J24.19@97.98,196.469 97.98,196.278 99.251,195.008 99.251,193.561 112.624,180.187 v1(112.624,168.783) 113.078,168.33 J29.33@113.078,164.889
IO13_L20P: J24.20 J29.35 | length 35.1
  Top Layer w0.152: J24.20@97.98,193.929 111.95,179.959 111.95,168.06 v1(112.578,167.432) J29.35@112.578,164.889
IO13_L21N: J24.17 J29.27 | length 37.4
  Top Layer w0.152: J24.17@100.52,196.469 100.52,196.342 101.79,195.072 101.79,193.611 114.124,181.278 v1(114.124,168.783) 114.578,168.33 J29.27@114.578,164.889
IO13_L21P: J24.18 J29.29 | length 34.7
  Top Layer w0.152: J24.18@100.52,193.929 113.474,180.975 113.474,168.036 v1(114.078,167.432) J29.29@114.078,164.889
IO13_L22N: J24.9 J29.23 | length 33.6
  Top Layer w0.152: J24.9@110.68,196.469 111.934,195.216 111.934,192.485 115.578,188.841 J29.23@115.578,164.889
IO13_L22P: J24.10 J29.25 | length 30.9
  Top Layer w0.152: J24.10@110.68,193.929 110.68,192.659 115.078,188.261 J29.25@115.078,164.889
IO34_25: J28.58
IO34_L7N: J28.23
IO34_L7P: J28.21
IO34_L8N: J28.19
IO34_L8P: J28.17
IO34_L11N: J24.38 J28.41 | length 34
  Top Layer w0.152: J28.41@87.078,164.889 v1(87.078,168.661)
  Bottom Layer w0.152: J24.38@75.12,193.929 75.12,192.138 87.078,180.181 v1(87.078,168.661)
IO34_L11P: J28.39
IO35_IO25: J26.10
IO35_L10N: J28.47
IO35_L10P: J28.45
IO35_L14P: J28.55 | length 4
  Top Layer w0.152: v1(83.185,168.719) 83.185,168.661 83.578,168.268 J28.55@83.578,164.889
IO35_L22N: J26.7 U6.5 | length 45.9
  Top Layer w0.152: v1(95.578,126.345) J26.7@95.578,128.889 ; U6.5@96.786,91.468 v1(99.33,91.468)
  Bottom Layer w0.152: v1(95.578,126.345) 95.578,125.631 96.049,125.16 96.049,123.891 103.327,116.612 103.327,93.648 101.741,92.062 99.924,92.062 v1(99.33,91.468)
IO35_L23N: J26.3 U6.3 | length 47.3
  Top Layer w0.152: v1(96.578,126.345) J26.3@96.578,128.889 ; U6.3@96.786,90.468 v1(99.33,90.468)
  Bottom Layer w0.152: v1(96.578,126.345) 97.079,125.845 97.079,124.206 104.14,117.145 104.14,93.269 101.339,90.468 v1(99.33,90.468)
IO35_L23P: J26.5 U6.4 | length 46.5
  Top Layer w0.152: J26.5@96.078,128.889 96.078,125.448 v1(96.531,124.995) ; U6.4@96.786,90.968 99.961,90.968 v1(100.432,91.44)
  Bottom Layer w0.152: v1(96.531,124.995) 96.531,123.839 103.659,116.712 103.659,93.448 101.651,91.44 v1(100.432,91.44)
J14: "LED7 RED.2" J26.20 | length 81.9
  Top Layer w0.152: v1(48.616,194.825) 48.616,196.545 48.623,196.553 ; v1(92.125,136.783) 92.578,136.33 J26.20@92.578,132.889
  Bottom Layer w0.152: v1(48.616,194.825) 48.616,185.773 92.125,142.264 v1(92.125,136.783)
J16: "LED5 RED.2" J26.14 | length 80.2
  Top Layer w0.152: v1(54.305,194.876) 54.305,196.596 54.313,196.603 ; v1(93.624,136.783) 94.078,136.33 J26.14@94.078,132.889
  Bottom Layer w0.152: v1(54.305,194.876) 54.305,181.966 93.624,142.646 v1(93.624,136.783)
K9: J29.28
K14: "LED6 RED.2" J26.22 | length 82.8
  Top Layer w0.152: v1(45.796,194.754) 45.796,196.474 45.804,196.481 ; J26.22@92.078,132.889 v1(92.078,135.433)
  Bottom Layer w0.152: v1(45.796,194.754) 45.796,187.884 91.491,142.189 91.491,136.734 92.078,136.147 v1(92.078,135.433)
K16: "LED4 RED.2" J26.16 | length 81.1
  Top Layer w0.152: v1(51.656,194.868) 51.656,196.589 51.664,196.596 ; J26.16@93.578,132.889 v1(93.578,135.433)
  Bottom Layer w0.152: v1(51.656,194.868) 51.656,183.676 92.964,142.368 92.964,136.761 93.578,136.147 v1(93.578,135.433)
L10: J29.26
LCD_B0: J25.23 J28.40 | length 44.5
  Top Layer w0.152: J25.23@50.038,152.4 84.887,152.4 87.566,155.08 87.566,160.878 J28.40@87.578,160.889
LCD_B1: J25.24 J28.42 | length 46.1
  Top Layer w0.152: J25.24@47.498,152.4 48.666,153.568 84.861,153.568 87.122,155.829 87.122,160.845 J28.42@87.078,160.889
LCD_B2: J25.25 J28.48 | length 40.3
  Top Layer w0.152: J25.25@50.038,154.94 50.358,154.94 50.999,155.448 84.138,155.448 85.578,156.888 J28.48@85.578,160.889
LCD_B3: J25.26 J28.50 | length 42
  Top Layer w0.152: J25.26@47.498,154.94 48.838,156.28 83.771,156.28 85.09,157.599 85.09,160.877 J28.50@85.078,160.889
LCD_B4: J25.29 J28.52 | length 39.2
  Top Layer w0.152: J25.29@50.038,160.02 52.705,160.02 55.816,156.909 83.476,156.909 84.582,158.015 84.582,160.885 J28.52@84.578,160.889
LCD_B5: J25.30 J28.54 | length 41.3
  Top Layer w0.152: J25.30@47.498,160.02 48.768,161.29 52.895,161.29 56.451,157.734 83.312,157.734 84.074,158.496 84.074,160.885 J28.54@84.078,160.889
LCD_B6: J25.31 J28.44 | length 49.3
  Top Layer w0.152: v1(53.086,154.178) 84.645,154.178 86.578,156.11 J28.44@86.578,160.889
  Bottom Layer w0.152: J25.31@50.038,162.56 50.079,162.601 51.013,162.601 51.194,162.42 53.034,160.58 53.086,160.528 v1(53.086,154.178)
LCD_B7: J25.32 J28.46 | length 52
  Top Layer w0.152: v1(54.419,154.813) 84.519,154.813 86.078,156.373 J28.46@86.078,160.889
  Bottom Layer w0.152: J25.32@47.498,162.56 48.704,163.766 52.324,163.766 54.419,161.671 v1(54.419,154.813)
LCD_DE: J25.36 J28.7 | length 72.3
  Top Layer w0.152: J25.36@47.498,167.64 45.783,167.64 43.878,169.545 43.878,175.247 46.228,177.597 90.079,177.597 95.578,172.097 J28.7@95.578,164.889
LCD_G0: J25.13 J28.22 | length 56.1
  Top Layer w0.152: J25.13@50.038,139.7 50.081,139.743 50.977,139.743 55.38,144.145 84.303,144.145 92.078,151.92 J28.22@92.078,160.889
LCD_G1: J25.14 J28.24 | length 57.8
  Top Layer w0.152: J25.14@47.498,139.7 48.831,141.034 50.617,141.034 54.3,144.716 83.883,144.716 91.578,152.411 J28.24@91.578,160.889
LCD_G2: J25.17 J28.26 | length 52.4
  Top Layer w0.152: J25.17@50.038,144.78 50.736,145.478 83.693,145.478 91.078,152.864 J28.26@91.078,160.889
LCD_G3: J25.18 J28.28 | length 54.2
  Top Layer w0.152: J25.18@47.498,144.78 48.822,146.104 83.303,146.104 90.578,153.379 J28.28@90.578,160.889
LCD_G4: J25.19 J28.30 | length 49.8
  Top Layer w0.152: J25.19@50.038,147.32 83.566,147.32 90.078,153.832 J28.30@90.078,160.889
LCD_G5: J25.20 J28.32 | length 51.6
  Top Layer w0.152: J25.20@47.498,147.32 48.768,148.59 84.004,148.59 89.578,154.164 J28.32@89.578,160.889
LCD_G6: J25.21 J28.34 | length 47.5
  Top Layer w0.152: J25.21@50.038,149.86 50.43,149.86 50.785,149.504 83.769,149.504 89.078,154.813 J28.34@89.078,160.889
LCD_G7: J25.22 J28.36 | length 49
  Top Layer w0.152: J25.22@47.498,149.86 48.768,151.13 84.48,151.13 88.578,155.228 J28.36@88.578,160.889
LCD_HSYNC: J25.34 J28.3 | length 79.7
  Top Layer w0.152: J25.34@47.498,165.1 47.475,165.123 46.104,165.123 42.608,168.618 42.608,175.895 45.847,179.133 90.678,179.133 96.578,173.234 J28.3@96.578,164.889
LCD_PCLK: J25.33 J28.9 | length 73.9
  Top Layer w0.152: v1(44.514,170.053) 44.514,175.07 46.355,176.911 90.106,176.911 95.078,171.939 J28.9@95.078,164.889
  Bottom Layer w0.152: v1(44.514,170.053) 44.514,168.593 46.799,166.306 48.831,166.306 J25.33@50.038,165.1
LCD_R0: J25.5 J28.4 | length 65.9
  Top Layer w0.152: J25.5@50.038,129.54 50.219,129.54 59.744,139.065 85.573,139.065 96.59,150.083 96.59,158.555 96.581,158.564 96.581,158.964 96.59,158.973 96.59,160.876 J28.4@96.578,160.889
LCD_R1: J25.6 J28.6 | length 67.8
  Top Layer w0.152: J25.6@47.498,129.54 48.753,130.795 50.373,130.795 59.151,139.573 85.407,139.573 96.078,150.244 J28.6@96.078,160.889
LCD_R2: J25.7 J28.8 | length 63.9
  Top Layer w0.152: J28.8@95.578,160.889 95.578,150.544 85.306,140.272 58.704,140.272 51.093,132.66 J25.7@50.43,132.08 ; J25.7@50.43,132.08 J25.7@50.038,132.08 J25.7@50.43,132.08
LCD_R3: J25.8 J28.10 | length 65.4
  Top Layer w0.152: J25.8@47.498,132.08 48.819,133.401 50.739,133.401 58.308,140.97 85.281,140.97 95.059,150.749 95.059,160.87 J28.10@95.078,160.889
LCD_R4: J25.9 J28.12 | length 61.1
  Top Layer w0.152: J25.9@50.038,134.62 51.174,134.82 51.194,134.824 58.039,141.668 85.217,141.668 94.578,151.029 J28.12@94.578,160.889
LCD_R5: J25.10 J28.14 | length 63.1
  Top Layer w0.152: J25.10@47.498,134.62 48.803,135.925 51.036,135.925 57.351,142.24 85.09,142.24 94.078,151.228 J28.14@94.078,160.889
LCD_R6: J25.11 J28.16 | length 58.8
  Top Layer w0.152: J25.11@50.038,137.16 50.058,137.18 51.067,137.18 56.889,143.002 84.988,143.002 93.578,151.592 J28.16@93.578,160.889
LCD_R7: J25.12 J28.18 | length 60.7
  Top Layer w0.152: J25.12@47.498,137.16 48.798,138.46 50.893,138.46 55.944,143.51 84.709,143.51 93.078,151.879 J28.18@93.078,160.889
LCD_VSYNC: J25.35 J28.5 | length 78.9
  Top Layer w0.152: J25.35@50.038,167.64 48.895,166.497 45.91,166.497 43.18,169.227 43.18,175.387 46.164,178.371 90.361,178.371 96.077,172.655 J28.5@96.078,164.889 J28.5@96.078,164.889
N17: J29.13 R20.1 | length 78.5
  Top Layer w0.152: J29.13@118.078,164.889 118.078,170.06 147.612,199.593 170.566,199.593 R20.1@176.682,193.476
N20: J29.5 R22.1 | length 59
  Top Layer w0.152: J29.5@120.078,164.889 120.078,169.266 146.918,196.106 160.662,196.106 161.646,195.123 R22.1@161.646,193.639
Net13_1: 13.1 R221.1 U31.6 | length 5.8
  Top Layer w0.305: R221.1@19.416,59.487 13.1@19.416,56.974 U31.6@22.699,56.974
Net23_1: 23.1 R222.1 U32.6 | length 8.9
  Top Layer w0.305: R222.1@39.307,61.133 23.1@39.306,56.959 40.386,55.88 U32.6@43.561,55.88
Net33_1: 33.1 R223.1 U33.6 | length 7.4
  Top Layer w0.305: R223.1@60.198,59.599 33.1@60.198,56.642 60.394,56.446 64.458,56.446 U33.6@64.516,56.388
Net43_1: 43.1 R224.1 U34.6 | length 7.1
  Top Layer w0.305: R224.1@82.702,59.355 82.753,59.304 82.753,56.502 43.1@82.804,56.451 82.811,56.459 86.915,56.459 U34.6@86.922,56.466
Net53_1: 53.1 R225.1 U35.6 | length 6.8
  Top Layer w0.305: R225.1@105.727,58.847 53.1@105.727,56.134 105.796,56.065 109.67,56.065 U35.6@109.728,56.007
Net63_1: 63.1 R226.1 U36.6 | length 6.9
  Top Layer w0.305: R226.1@128.829,59.073 128.867,59.035 128.867,56.553 63.1@128.905,56.515 128.934,56.486 133.209,56.486 U36.6@133.238,56.456
Net73_1: 73.1 R227.1 U37.6 | length 6.9
  Top Layer w0.305: R227.1@152.083,58.58 73.1@152.082,55.753 152.195,55.64 156.049,55.64 U37.6@156.107,55.582
Net83_1: 83.1 R228.1 U38.6 | length 7.2
  Top Layer w0.305: R228.1@174.498,59.482 83.1@174.498,56.134 174.522,56.11 178.284,56.11 U38.6@178.308,56.085
NetC5_1: C5.1 L1.1 U1.2
NetC5_2: C5.2 U1.6 | length 3.7
  Top Layer w0.152: U1.6@13.523,190.985 14.963,190.985 15.811,191.833 C5.2@15.811,192.85
NetC6_1: C6.1 L2.1 U2.2
NetC6_2: C6.2 U2.6 | length 3.4
  Top Layer w0.152: U2.6@13.142,161.671 14.224,161.671 15.438,162.885 15.438,162.945 15.751,163.258 C6.2@15.811,163.258
NetC15_2: C15.2 R6.2 R8.2 U1.4 | length 5.2
  Top Layer w0.152: C15.2@11.496,188.372 11.623,188.499 U1.4@11.623,190.985 ; R8.2@11.508,185.832 R6.2@11.508,187.102 C15.2@11.508,188.341
NetC16_2: C16.2 R7.2 R9.2 U2.4 | length 4.8
  Top Layer w0.152: U2.4@11.239,161.607 11.239,160.167 11.772,159.634 C16.2@11.772,159.534 ; R7.2@11.76,158.264 C16.2@11.76,159.499 ; R9.2@11.772,156.963 R7.2@11.772,158.268
NetC17_1: C17.1 L3.1 U3.2
NetC17_2: C17.2 U3.6 | length 3.2
  Top Layer w0.152: U3.6@13.015,176.57 14.074,176.57 15.113,177.609 C17.2@15.113,178.308
NetC22_2: C22.2 R12.2 R13.2 U3.4 | length 4.9
  Top Layer w0.152: R13.2@11.049,171.704 R12.2@11.049,172.974 C22.2@11.049,174.244 11.049,176.53 U3.4@11.112,176.594
NetC28_1: C28.1 U6.36 | length 22.8
  Top Layer w0.152: C28.1@74.163,109.728 76.962,109.728 78.359,108.331 78.359,99.005 81.925,95.439 84.553,95.439 85.558,95.44 U6.36@85.586,95.468
NetC30_1: C30.1 U6.39 | length 13.7
  Top Layer w0.152: C30.1@74.229,99.314 74.229,99.124 79.385,93.968 U6.39@85.586,93.968
NetC40_2: C40.2 U6.44 U6.45 | length 15.4
  Top Layer w0.152: C40.2@73.975,83.375 73.975,83.566 81.377,90.968 U6.45@85.586,90.968 U6.44@85.586,91.468
NetC42_2: C42.2 J23.1 | length 5
  Top Layer w0.152: C42.2@179.307,99.924 179.348,99.964 J23.1@179.348,104.879
NetC78_2: C78.2 R92.1 R93.1 SW2.1 SW2.4 Z1.2 | length 24.6
  Top Layer w0.152: SW2.4@106.192,222.123 115.056,222.123 115.126,222.054 Z1.2@115.126,212.096 112.845,212.096 C78.2@112.84,212.09 R93.1@109.474,212.09
NetC80_2: C80.2 R94.1 R95.1 SW4.1 SW4.4 Z2.2 | length 24.4
  Top Layer w0.152: SW4.4@128.95,222.174 SW4.1@137.75,222.174 ; R95.1@132.017,212.233 R94.1@133.414,212.233 135.37,212.233 C80.2@135.445,212.308 135.509,212.372 Z2.2@137.795,212.372 SW4.1@137.795,222.117
NetC81_2: C81.2 R97.1 R98.1 SW5.1 SW5.4 Z3.2 | length 23.8
  Top Layer w0.152: SW5.4@11.246,222.479 SW5.1@20.046,222.479 ; R98.1@13.335,214.114 14.72,214.114 R97.1@14.732,214.102 ; R97.1@14.798,214.111 C81.2@17.463,214.111 ; C81.2@17.526,214.114 Z3.2@20.13,214.114 20.13,222.436 SW5.1@20.168,222.474
NetC82_2: C82.2 R102.1 R104.1 SW6.1 SW6.4 Z4.2 | length 24.1
  Top Layer w0.152: SW6.4@32.887,222.428 SW6.1@41.687,222.428 ; R104.1@35.17,213.613 R102.1@36.71,213.613 ; R102.1@36.697,213.611 C82.2@39.044,213.611 ; C82.2@39.044,213.64 Z4.2@41.726,213.64 SW6.1@41.726,222.416
NetC83_2: C83.2 R108.1 R109.1 SW7.1 SW7.4 Z5.2 | length 23.4
  Top Layer w0.152: SW7.4@75.305,222.428 SW7.1@84.105,222.428 ; R108.1@78.378,213.676 R109.1@79.648,213.676 C83.2@81.998,213.676 82.004,213.682 84.214,213.682 Z5.2@84.22,213.676 ; SW7.1@84.207,222.428 84.22,222.415 Z5.2@84.22,213.682
NetC84_2: C84.2 R110.1 R111.1 SW8.1 SW8.4 Z6.2 | length 23.6
  Top Layer w0.152: SW8.4@53.766,222.428 SW8.1@62.566,222.428 ; R111.1@56.706,213.526 57.964,213.526 R110.1@57.976,213.538 ; R110.1@57.975,213.55 60.069,213.55 C84.2@60.135,213.484 ; C84.2@60.135,213.49 Z6.2@62.611,213.49 62.611,222.326 SW8.1@62.636,222.352
NetC146_2: C146.2 U20.4 | length 9.7
  Top Layer w0.152: U20.4@175.704,83.782 175.704,84.493 177.012,85.801 180.289,85.801 182.562,83.528 C146.2@182.562,82.919
NetC157_2: C157.2 U100.42 Y7.3 | length 12.2
  Top Layer w0.152: Y7.3@164.338,98.704 164.238,98.704 163.409,99.533 163.409,101.722 164.084,102.396 164.084,103.993 164.324,104.233 164.818,104.233 164.953,104.367 164.953,104.817 165.389,105.254 166.654,105.254 167.831,106.432 167.831,106.831 167.689,106.974 167.689,107.52 U100.42@167.665,107.544
NetC158_2: C158.2 U100.43 Y7.1 | length 7.6
  Top Layer w0.152: C158.2@166.171,104.328 166.271,104.328 166.545,104.602 166.545,104.714 168.136,106.305 168.136,106.743 168.136,107.198 168.136,107.24 168.065,107.311 U100.43@168.065,107.544 ; C158.2@166.221,104.278 166.283,104.215 166.283,103.839 166.849,103.273 Y7.1@166.849,101.044
NetC261_1: C261.1 L242.2 U241.2 | length 16.6
  Top Layer w0.508: U241.2@5.461,102.362 7.747,100.076 L242.2@16.51,100.076 16.51,102.892 17.758,104.14 C261.1@17.78,104.14
NetC267_1: C267.1 L243.2 U242.2 | length 15.8
  Top Layer w0.508: U242.2@5.588,68.58 7.62,66.548 L243.2@16.256,66.548 16.256,69.366 17.248,70.358 C267.1@17.272,70.358
NetCON2_1: CON2.1 J5.1 R14.1 U5.6 | length 19
  Top Layer w0.152: U5.6@176.022,139.167 176.772,139.167 177.153,138.786 J5.1@180.975,138.786 R14.1@184.023,138.786 192.278,138.786 193.548,137.516 CON2.1@194.31,137.516
NetCON2_2: CON2.2 R15.2 R18.1 U5.7 | length 19.7
  Top Layer w0.152: U5.7@175.895,140.437 176.708,140.437 177.152,139.992 183.325,139.992 R15.2@183.388,140.056 191.77,140.056 CON2.2@194.31,142.596
NetD1_1: D1.1 R1.2 | length 2.8
  Top Layer w0.152: R1.2@141.602,82.169 141.602,81.092 141.922,80.772 D1.1@141.922,79.502
NetF1_1: F1.1 SW1.2
NetF241_1: F241.1 SW241.3
NetJ5_2: J5.2 R15.1 | length 2.5
  Top Layer w0.152: J5.2@180.975,141.326 183.158,141.326 R15.1@183.388,141.556
NetJ23_12: J23.12 R48.2 | length 11.5
  Top Layer w0.152: R48.2@187.088,97.542 187.088,97.642 191.364,101.918 191.364,104.74 J23.12@193.138,106.514
NetJ23_13: J23.13 R61.2 | length 18.3
  Top Layer w0.152: R61.2@187.088,98.857 187.088,98.957 190.193,102.062 190.193,111.739 J23.13@193.138,114.684
NetJACK1_1: JACK1.1 SW1.1
NetL5_1: L5.1 U100.48
NetLED1_1: LED1.1 R10.1 | length 1.3
  Top Layer w0.152: LED1.1@16.7,170.434 16.764,170.498 R10.1@16.764,171.728
"NetLED2 RED_1": "LED2 RED.1" R96.2 | length 2
  Top Layer w0.152: 127.96,112.166 128.087,112.039 R96.2@128.087,110.261
"NetLED3 RED_1": "LED3 RED.1" R99.2 | length 1.9
  Top Layer w0.152: 125.247,112.116 125.311,112.052 R99.2@125.311,110.211
"NetLED4 RED_1": "LED4 RED.1" R103.2 | length 1.8
  Top Layer w0.152: 51.656,199.159 R103.2@51.656,201.001
"NetLED5 RED_1": "LED5 RED.1" R105.2 | length 2.1
  Top Layer w0.152: R105.2@54.242,201.18 54.305,201.117 54.305,199.136
"NetLED6 RED_1": "LED6 RED.1" R106.2 | length 2.2
  Top Layer w0.152: 45.796,199.014 45.796,201.109 R106.2@45.86,201.173
"NetLED7 RED_1": "LED7 RED.1" R107.2 | length 1.8
  Top Layer w0.152: R107.2@48.585,200.888 48.585,199.116 48.616,199.085
"NetLED8 RED_1": "LED8 RED.1" R113.2 | length 2
  Top Layer w0.152: 170.29,149.758 170.323,149.725 R113.2@172.291,149.725
NetP241_2: P241.2 SW241.2
NetQ1_1: Q1.1 R20.2 | length 2.5
  Top Layer w0.152: R20.2@176.682,192.176 176.71,192.149 Q1.1@176.71,189.728
NetQ2_1: Q2.1 R21.2 | length 2.5
  Top Layer w0.152: Q2.1@168.844,189.804 168.844,192.273 R21.2@168.859,192.288
NetQ3_1: Q3.1 R22.2 | length 2.7
  Top Layer w0.152: R22.2@161.646,192.339 161.673,192.312 Q3.1@161.673,189.697
NetQ4_1: Q4.1 R23.2 | length 2.6
  Top Layer w0.152: Q4.1@154.815,189.829 R23.2@154.815,192.367 ; R23.2@154.866,192.367 R23.2@154.94,192.441
NetR2_1: R2.1 R11.2 U6.34 | length 42.7
  Top Layer w0.152: v1(82.652,96.825) 83.536,96.825 83.893,96.468 U6.34@85.586,96.468 ; v1(112.141,91.418) 112.14,91.42 112.14,93.098 R2.1@112.139,93.099 R11.2@114.054,93.099
  Bottom Layer w0.152: v1(82.652,96.825) 82.652,93.218 83.478,92.391 86.476,92.391 89.749,89.118 110.327,89.118 112.141,90.932 v1(112.141,91.418)
NetR3_1: R3.1 U6.7 | length 9.9
  Top Layer w0.152: U6.7@96.786,92.468 104.408,92.468 105.857,93.916 R3.1@105.857,94.107
NetR4_1: R4.1 R16.2 U6.8 | length 12.5
  Top Layer w0.152: U6.8@96.786,92.968 102.876,92.968 105.857,95.948 R4.1@105.857,96.139 105.857,98.169 R16.2@105.855,98.171
NetR5_1: R5.1 R19.2 U6.6 | length 11.1
  Top Layer w0.152: U6.6@96.786,91.968 105.75,91.968 R5.1@105.857,92.075 R19.2@105.857,90.043
NetR24_1: R24.1 SMG1.3 | length 3.8
  Top Layer w0.152: SMG1.3@166.929,178.054 166.929,181.813 R24.1@166.98,181.864
NetR25_1: R25.1 SMG1.5 | length 3.7
  Top Layer w0.152: SMG1.5@161.849,178.054 R25.1@161.849,181.762
NetR26_1: R26.1 SMG1.10 | length 3.7
  Top Layer w0.152: SMG1.10@166.929,167.894 166.929,164.328 R26.1@167.03,164.226
NetR27_1: R27.1 SMG1.1 | length 3.9
  Top Layer w0.152: SMG1.1@172.009,178.054 R27.1@172.009,181.936
NetR28_1: R28.1 SMG1.2 | length 3.8
  Top Layer w0.152: SMG1.2@169.469,178.054 169.469,181.813 R28.1@169.52,181.864
NetR29_1: R29.1 SMG1.4 | length 4.1
  Top Layer w0.152: R29.1@164.44,181.762 164.389,181.712 SMG1.4@164.389,178.054 SMG1.4@164.643,177.8
NetR30_1: R30.1 SMG1.7 | length 3.6
  Top Layer w0.152: R30.1@159.258,164.287 159.309,164.338 SMG1.7@159.309,167.894
NetR31_1: R31.1 SMG1.11 | length 3.7
  Top Layer w0.152: SMG1.11@169.469,167.894 169.469,164.287 R31.1@169.52,164.236
NetR55_1: R55.1 U100.39 | length 6.3
  Top Layer w0.152: R55.1@162.069,104.328 162.169,104.328 163.974,106.133 165.982,106.133 166.444,106.595 166.444,107.523 U100.39@166.465,107.544
NetR60_1: R60.1 U100.20 | length 11.5
  Top Layer w0.152: R60.1@160.63,119.583 160.63,118.212 162.052,116.789 166.37,116.789 167.265,115.894 U100.20@167.265,113.359
NetR63_1: R63.1 U100.32 | length 5.7
  Top Layer w0.152: R63.1@159.471,110.293 160.847,110.293 161.287,109.853 U100.32@164.955,109.853
NetR184_1: R184.1 USBC1.B5 | length 3.9
  Top Layer w0.152: R184.1@188.023,84.455 188.951,84.455 189.371,84.034 USBC1.B5@191.707,84.034